# Altium PCB waffle.PcbDoc
Units mm, origin at the board's own origin, x right, y up, seen from the top; angles counter-clockwise.
Board outline 181 x 137.5 mm, 2 copper layers (Top Layer, Bottom Layer), stack 1.57 mm thick; 68 components, 42 nets, 632 pads, 68 vias.
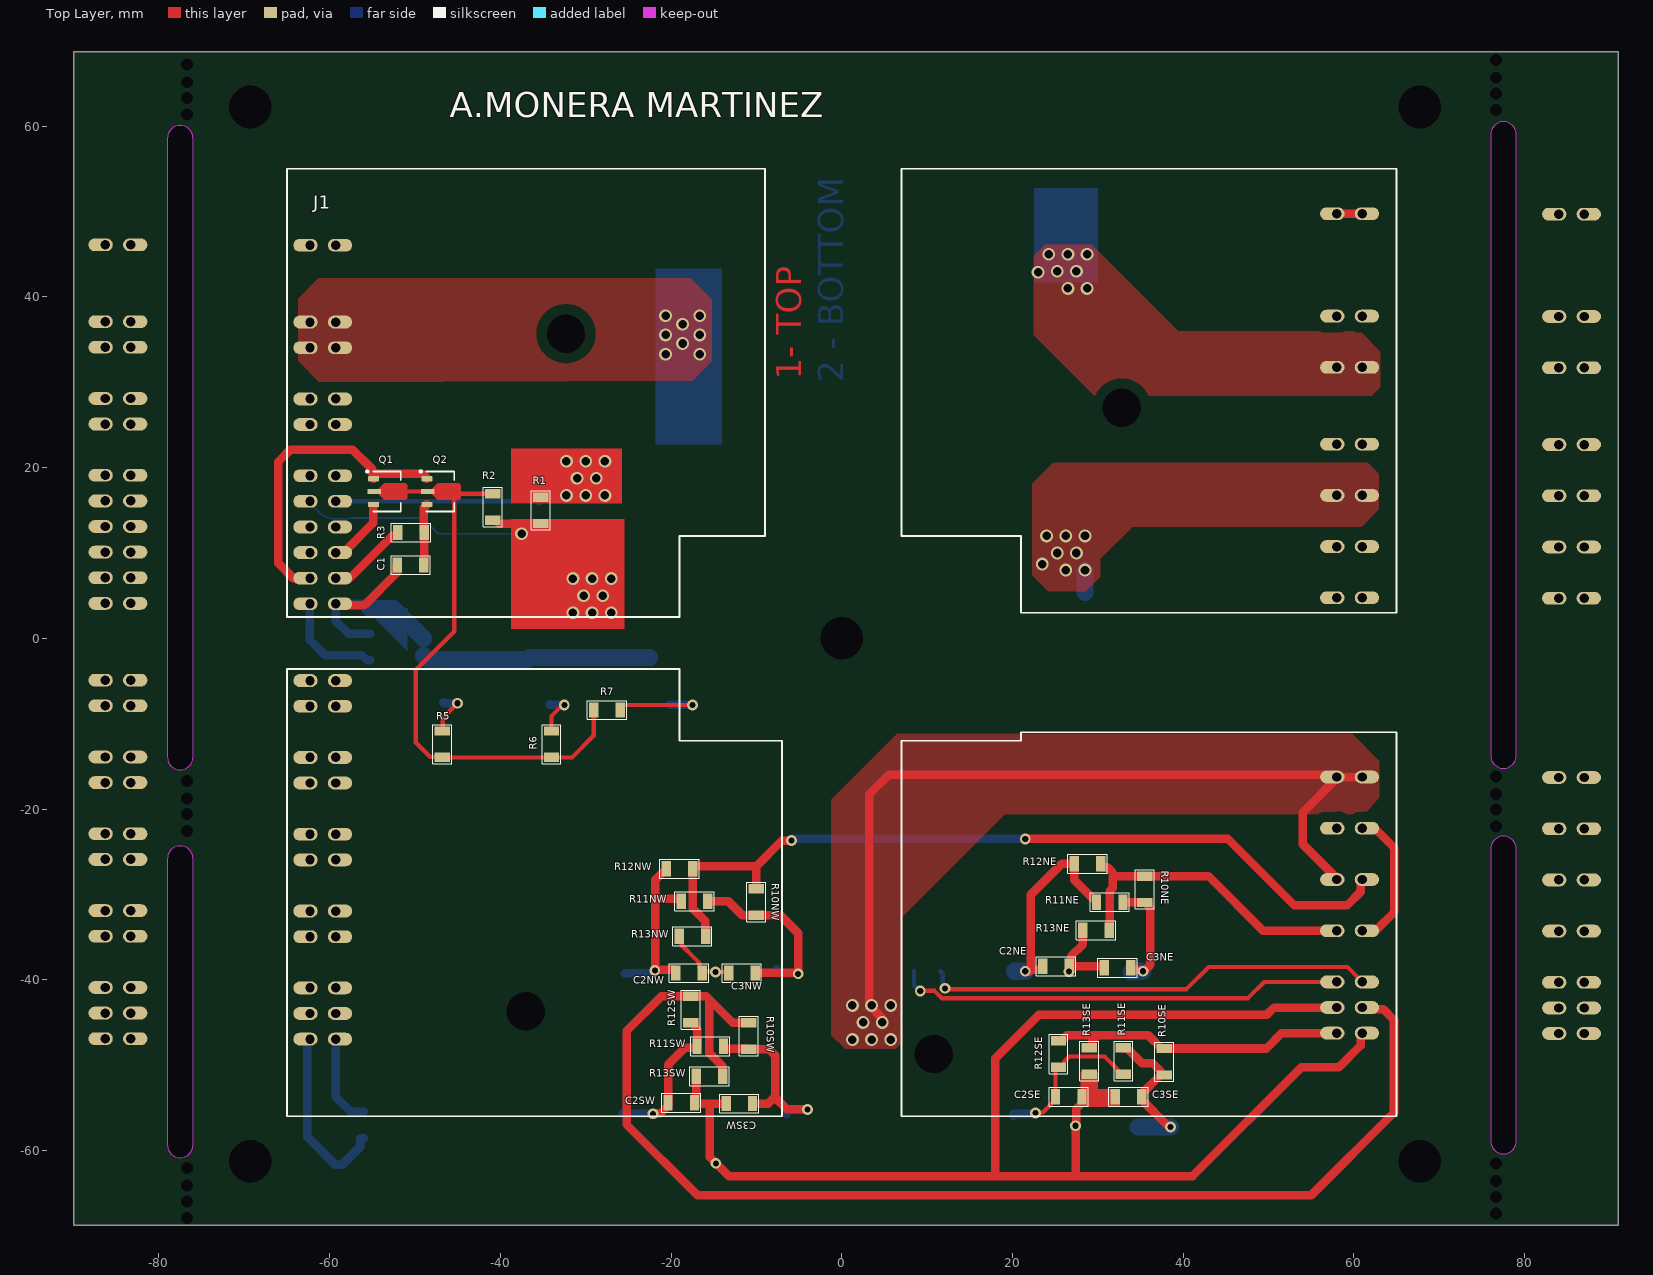
[diagram p0: Top Layer view]
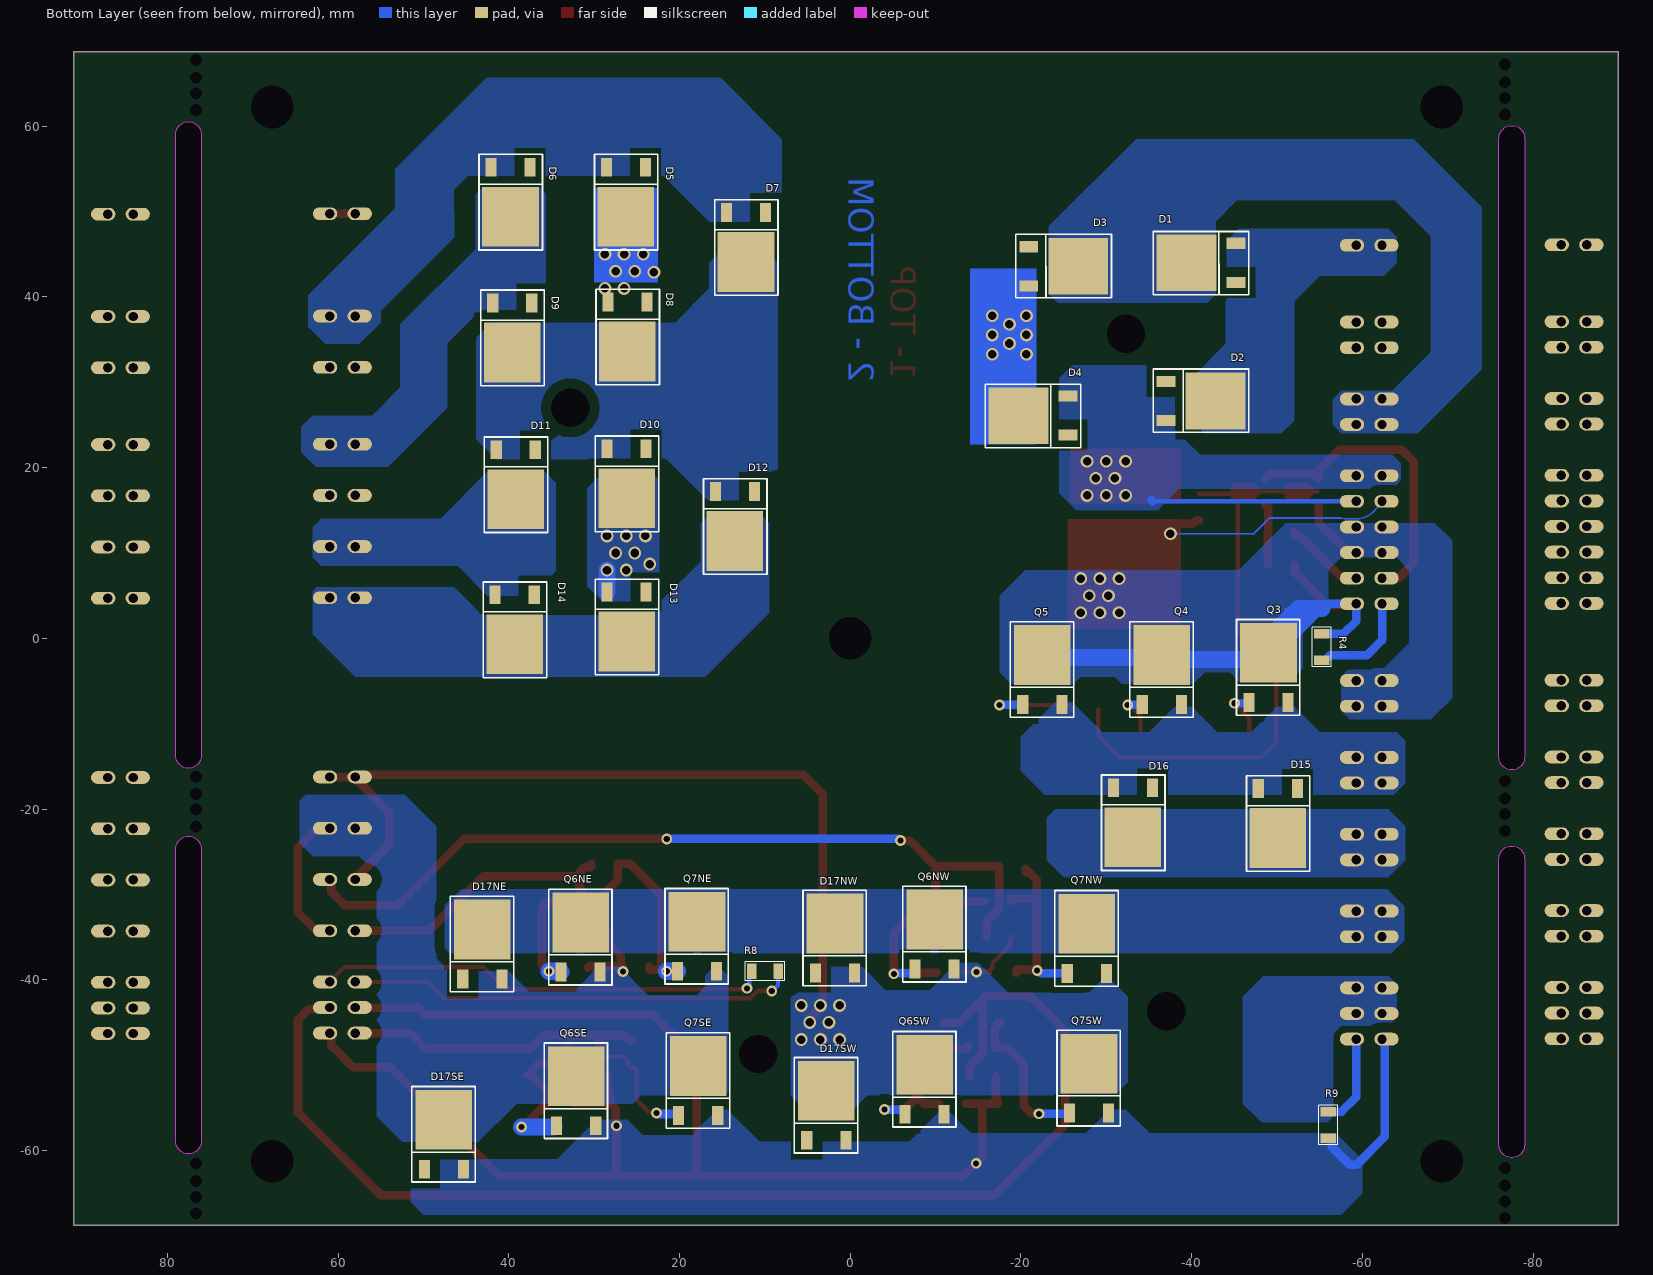
[diagram p1: Bottom Layer view, seen from below]

## Layer stack, top to bottom
Top Solder: solder mask 0.0254, SM-001, Dk 4
Top Layer: signal copper 0.035
Dielectric 1: core 1.5, Core-043, Dk 4.3
Bottom Layer: signal copper 0.035
Bottom Solder: solder mask 0.0254, SM-001, Dk 4

## Board outline
-90,-68.75 91,-68.75 91,68.75 -90,68.75
cut-out: -79,-13.9 ccw(c-77.5,-13.9) -76,-13.9 -76,58.575 ccw(c-77.5,58.575) -79,58.575
cut-out: -79,-59.325 ccw(c-77.5,-59.325) -76,-59.325 -76,-25.825 ccw(c-77.5,-25.825) -79,-25.825
cut-out: 76.025,-13.725 ccw(c77.525,-13.725) 79.025,-13.725 79.025,59.025 ccw(c77.525,59.025) 76.025,59.025
cut-out: 76.025,-58.9 ccw(c77.525,-58.9) 79.025,-58.9 79.025,-24.675 ccw(c77.525,-24.675) 76.025,-24.675

## Design rules (kind name [scope] priority, off if disabled: settings)
Clearance "Clearance_ hv" [InNetClass('HV_CLASS')] p1: gap=1.2 ignorepadtopadclearanceinfootprint=FALSE
Clearance "Clearance general" [All] p2: gap=0.2 ignorepadtopadclearanceinfootprint=FALSE
ComponentClearance ComponentClearance_1 [All] p1: gap=0.2 collisioncheckmode=3 verticalgap=0 showdistances=FALSE
ComponentClearance [All] p2: gap=0.254 collisioncheckmode=3 verticalgap=0.254 showdistances=FALSE
HoleSize [All] p1: absolutevalues=TRUE maxlimit=10 minlimit=0.5 maxpercent=80.000 minpercent=20.000
MinimumSolderMaskSliver [All] p1: minsoldermaskwidth=0.1
PlaneClearance [All] p1: clearance=0.5
PlaneConnect [All] p1: planeconnectstyle=Direct reliefexpansion=0.508 reliefentries=4 reliefconductorwidth=0.254 reliefairgap=0.254
PolygonConnect [All] p1: connectstyle=Direct reliefconductorwidth=0.254 reliefentries=4 polygonreliefangle="90 Angle" airgapwidth=0.254
RoomDefinition waffle [InComponentClass('waffle')] p1: confinementstyle=ConfineIn formatcopy=TRUE lockcomponents=FALSE outline -76.618,-69.312 76.382,-69.312 76.382,69.388 -76.618,69.388
RoomDefinition sw [InComponentClass('sw')] p2: confinementstyle=ConfineIn formatcopy=TRUE lockcomponents=FALSE outline -32.018,-60.612 6.882,-60.612 6.882,-40.812 -32.018,-40.812
RoomDefinition se [InComponentClass('se')] p3: confinementstyle=ConfineIn formatcopy=TRUE lockcomponents=FALSE outline 13.682,-64.012 51.682,-64.012 51.682,-46.012 13.682,-46.012
RoomDefinition nw [InComponentClass('nw')] p4: confinementstyle=ConfineIn formatcopy=TRUE lockcomponents=FALSE outline -31.818,-41.112 5.882,-41.112 5.882,-25.512 -31.818,-25.512
RoomDefinition ne [InComponentClass('ne')] p5: confinementstyle=ConfineIn formatcopy=TRUE lockcomponents=FALSE outline 13.882,-41.712 47.182,-41.712 47.182,-24.912 13.882,-24.912
RoutingVias [All] p1: holewidth=0.7 width=1.2 viastyle="Through Hole" minholewidth=0.5 minwidth=1.2 maxholewidth=3.2 maxwidth=5
SilkToSilkClearance [All] p1: silktosilkclearance=0.1
SilkToSolderMaskClearance [IsPad] p1: minsilkscreentomaskgap=0.1 clearancetoexposedcopper=TRUE
SolderMaskExpansion [All] p1: expansion=0.102 istentingtop=FALSE
SupplyNets "Schematic Supply Nets" [InNet('GND')] p1: voltage=0.000
Width bot [OnLayer('Bottom Layer')] p1: maxlimit=10 minlimit=0.2 preferedwidth=2
Width top [OnLayer('Top Layer')] p2: maxlimit=1 minlimit=0.5 preferedwidth=1
Width [All] p3: maxlimit=20 minlimit=1 preferedwidth=2
23 further rules are at their usual default settings.

## Classes and differential pairs
net class HV_CLASS: GND L2 N0A N1 N-N1 N-N1_SHUNT NetD1_A NetD1_K NetD2_A NetD3_A NetD7_K p P0A p1 T1A T4A T5A T6A T7A T8A
channel class "igbt pair": ne nw se sw
component class waffle: C1 D1 D2 D3 D4 D5 D6 D7 D8 D9 D10 D11 D12 D13 D14 D15 D16 J1 Q1 Q2 Q3 Q4 Q5 R1 R2 R3 R4 R5 R6 R7 R8 R9
component class sw: C2SW C3SW D17SW Q6SW Q7SW R10SW R11SW R12SW R13SW
component class se: C2SE C3SE D17SE Q6SE Q7SE R10SE R11SE R12SE R13SE
component class nw: C2NW C3NW D17NW Q6NW Q7NW R10NW R11NW R12NW R13NW
component class ne: C2NE C3NE D17NE Q6NE Q7NE R10NE R11NE R12NE R13NE

## Components (designator, comment, footprint, x,y, rotation, side; value= is the part's Value field where it differs from the comment)
C1 "1uf" 1206 -50.5,8.6 r180 top value=1uF
C2NE "1nF" 1206 25.1,-38.4 r0 top (schematic designator C2)
C2NW "1nF" 1206 -17.9,-39.2 r0 top (schematic designator C2)
C2SE "1nF" 1206 26.6,-53.7 r0 top (schematic designator C2)
C2SW "1nF" 1206 -18.8,-54.4 r0 top (schematic designator C2)
C3NE "1nF" 1206 32.3,-38.6 r180 top (schematic designator C3)
C3NW "1nF" 1206 -11.7,-39.2 r180 top (schematic designator C3)
C3SE "1nF" 1206 33.6,-53.7 r180 top (schematic designator C3)
C3SW "1nF" 1206 -12,-54.5 r180 top (schematic designator C3)
D1 "SE20DLJ-M3/I" "PG-TO252-3 - DIODE" -39.7,44 r90 bottom
D2 "SE20DLJ-M3/I" "PG-TO252-3 - DIODE" -42.5,27.81 r270 bottom
D3 "SE20DLJ-M3/I" "PG-TO252-3 - DIODE" -26.4,43.59 r270 bottom
D4 "SE20DLJ-M3/I" "PG-TO252-3 - DIODE" -20,26.09 r90 bottom
D5 "SE20DLJ-M3/I" "PG-TO252-3 - DIODE" 26.29,49.7 r0 bottom
D6 "SE20DLJ-M3/I" "PG-TO252-3 - DIODE" 39.81,49.7 r0 bottom
D7 "SE20DLJ-M3/I" "PG-TO252-3 - DIODE" 12.21,44.4 r0 bottom
D8 "SE20DLJ-M3/I" "PG-TO252-3 - DIODE" 26.11,33.9 r0 bottom
D9 "SE20DLJ-M3/I" "PG-TO252-3 - DIODE" 39.6,33.8 r0 bottom
D10 "SE20DLJ-M3/I" "PG-TO252-3 - DIODE" 26.2,16.7 r0 bottom
D11 "SE20DLJ-M3/I" "PG-TO252-3 - DIODE" 39.19,16.6 r0 bottom
D12 "SE20DLJ-M3/I" "PG-TO252-3 - DIODE" 13.51,11.7 r0 bottom
D13 "SE20DLJ-M3/I" "PG-TO252-3 - DIODE" 26.2,-0.066 r0 bottom
D14 "SE20DLJ-M3/I" "PG-TO252-3 - DIODE" 39.31,-0.4 r0 bottom
D15 "SE20DLJ-M3/I" "PG-TO252-3 - DIODE" -50.09,-23.1 r0 bottom
D16 "SE20DLJ-M3/I" "PG-TO252-3 - DIODE" -33.11,-23 r0 bottom
D17NE "SE20DLJ-M3/I" "PG-TO252-3 - DIODE" 43.11,-34.4 r180 bottom (schematic designator D17)
D17NW "SE20DLJ-M3/I" "PG-TO252-3 - DIODE" 1.79,-33.7 r180 bottom (schematic designator D17)
D17SE "SE20DLJ-M3/I" "PG-TO252-3 - DIODE" 47.61,-56.7 r180 bottom (schematic designator D17)
D17SW "SE20DLJ-M3/I" "PG-TO252-3 - DIODE" 2.81,-53.3 r180 bottom (schematic designator D17)
J1 "connector_waffle" WAFFLE -76,68.75 r0 top locked
Q1 "BCX53-16" SOT-89 -53.496,17.2 r0 top value=PNP
Q2 "BCX56-16" SOT-89 -47.246,17.2 r0 top value=NPN
Q3 "HGT1S10N120BNST" PG-TO252-3 -49,-2 r180 bottom
Q4 "HGT1S10N120BNST" PG-TO252-3 -36.5,-2.25 r180 bottom
Q5 "HGT1S10N120BNST" PG-TO252-3 -22.5,-2.25 r180 bottom
Q6NE "HGT1S10N120BNST" PG-TO252-3 31.59,-33.6 r180 bottom (schematic designator Q6)
Q6NW "HGT1S10N120BNST" PG-TO252-3 -9.882,-33.25 r180 bottom (schematic designator Q6)
Q6SE "HGT1S10N120BNST" PG-TO252-3 32.11,-51.6 r180 bottom (schematic designator Q6)
Q6SW "HGT1S10N120BNST" PG-TO252-3 -8.71,-50.25 r180 bottom (schematic designator Q6)
Q7NE "HGT1S10N120BNST" PG-TO252-3 17.96,-33.5 r180 bottom (schematic designator Q7)
Q7NW "HGT1S10N120BNST" PG-TO252-3 -27.71,-33.75 r180 bottom (schematic designator Q7)
Q7SE "HGT1S10N120BNST" PG-TO252-3 17.81,-50.4 r180 bottom (schematic designator Q7)
Q7SW "HGT1S10N120BNST" PG-TO252-3 -27.965,-50.123 r180 bottom (schematic designator Q7)
R1 "1mOHM" 1206 -35.25,15 r90 top
R2 "10K" 1206 -40.9,15.4 r270 top
R3 "43R" 1206 -50.45,12.4 r0 top
R4 "NB20N50104JBA" 1206 -55.25,-1 r90 bottom value=TH201
R5 "39R" 1206 -46.8,-12.4 r270 top
R6 "39R" 1206 -34,-12.4 r270 top
R7 "39R" 1206 -27.5,-8.4 r180 top
R8 "NB20N50104JBA" 1206 10,-39 r0 bottom value=TH201
R9 "1mOHM" 1206 -56,-57 r90 bottom
R10NE "10R" 1206 35.5,-29.4 r270 top (schematic designator R10)
R10NW "10R" 1206 -10,-30.9 r270 top (schematic designator R10)
R10SE "10R" 1206 37.8,-49.6 r270 top (schematic designator R10)
R10SW "10R" 1206 -10.9,-46.6 r270 top (schematic designator R10)
R11NE "10R" 1206 31.4,-30.9 r0 top (schematic designator R11)
R11NW "10R" 1206 -17.25,-30.8 r0 top (schematic designator R11)
R11SE "10R" 1206 33,-49.5 r90 top (schematic designator R11)
R11SW "10R" 1206 -15.4,-47.8 r0 top (schematic designator R11)
R12NE "10R" 1206 28.8,-26.4 r180 top (schematic designator R12)
R12NW "10R" 1206 -19,-27 r180 top (schematic designator R12)
R12SE "10R" 1206 25.4,-48.7 r270 top (schematic designator R12)
R12SW "10R" 1206 -17.7,-43.5 r270 top (schematic designator R12)
R13NE "1K" 1206 29.8,-34.2 r0 top (schematic designator R13)
R13NW "1K" 1206 -17.5,-34.9 r0 top (schematic designator R13)
R13SE "1K" 1206 29,-49.5 r90 top (schematic designator R13)
R13SW "1K" 1206 -15.5,-51.3 r0 top (schematic designator R13)

## Footprints (in the part's own frame and the unit in brackets; to place one, negate y for a bottom-side part, rotate by r counter-clockwise, add the part's x,y. Pads: shape width x height; smd on the part's side, far side on the other; paste and mask are expansions set on the pad)
1206 [mm] "Footprint 1206"
  rect 1.1x1.8 smd: 1(-1.55,0) 2(1.55,0)
  silkscreen extent -2.3,-1.1 2.3,1.1, body extent -1.61,-0.87 1.61,0.88, height 0.6
PG-TO252-3 [mm]
  rect 1.3x2.2 smd: 1(-2.29,-5.5) 2(2.29,-5.5)
  rect 6.63x7 smd: 3(0,0.3)
  silkscreen extent -3.75,-7 3.67,4.2, body extent -3.75,-6.25 3.75,3.5, height 2.41
"PG-TO252-3 - DIODE" [mm]
  rect 1.3x2.2 smd: A(2.29,-5.5) NC(-2.29,-5.5)
  rect 6.63x7 smd: K(0,0.3)
  silkscreen extent -3.75,-7 3.67,4.2, body extent -3.75,-6.25 3.75,3.5, height 2.41
SOT-89 [mm]
  rrect25% 1.3x0.6 smd: 1(-1.354,1.5) 3(-1.354,-1.5)
  rrect25% 1.6x0.6 smd: 2(-1.254,0)
  Top Layer region: -0.754,0.3 -0.104,0.95 2.425,0.95 2.613,0.762 2.613,-0.762 2.425,-0.95 -0.104,-0.95 -0.754,-0.3
  silkscreen extent -2.21,-2.35 1.85,2.47, body extent -1.75,-2.25 2.35,2.25, height 1.5
WAFFLE [mm]
  oval 2.5x1.5 smd: 1(13,-22.7) 2(17.4,-22.7) 3(13,-31.7) 4(17.4,-31.7) 5(13,-34.7) 6(17.4,-34.7) 7(13,-40.7) 8(17.4,-40.7) 9(13,-43.7) 10(17.4,-43.7) 11(13,-49.7) 12(17.4,-49.7) 13(13,-52.7) 14(17.4,-52.7) 15(13,-55.7) 16(17.4,-55.7) 17(13,-58.7) 18(17.4,-58.7) 19(13,-61.7) 20(17.4,-61.7) 21(13,-64.7) 22(17.4,-64.7) 23(13,-73.7) 24(17.4,-73.7) 25(13,-76.7) 26(17.4,-76.7) 27(13,-82.7) 28(17.4,-82.7) 29(13,-85.7) 30(17.4,-85.7) 31(13,-91.7) 32(17.4,-91.7) 33(13,-94.7) 34(17.4,-94.7) 35(13,-100.7) 36(17.4,-100.7) 37(13,-103.7) 38(17.4,-103.7) 39(13,-109.7) 40(17.4,-109.7) 41(13,-112.7) 42(17.4,-112.7) 43(13,-115.7) 44(17.4,-115.7) 45(133.3,-19.005) 46(137.7,-19.005) 47(133.3,-31) 48(137.7,-31) 49(133.3,-37) 50(137.7,-37) 51(133.3,-46) 52(137.7,-46) 53(133.3,-52) 54(137.7,-52) 55(133.3,-58) 56(137.7,-58) 57(133.3,-64) 58(137.7,-64) 59(133.3,-85) 60(137.7,-85) 61(133.3,-91) 62(137.7,-91) 63(133.3,-97) 64(137.7,-97) 65(133.3,-103) 66(137.7,-103) 67(133.3,-109) 68(137.7,-109) 69(133.3,-112) 70(137.7,-112) 71(133.3,-115) 72(137.7,-115)
  oval 2.5x1.5 smd far side: 1(13,-22.7) 2(17.4,-22.7) 3(13,-31.7) 4(17.4,-31.7) 5(13,-34.7) 6(17.4,-34.7) 7(13,-40.7) 8(17.4,-40.7) 9(13,-43.7) 10(17.4,-43.7) 11(13,-49.7) 12(17.4,-49.7) 13(13,-52.7) 14(17.4,-52.7) 15(13,-55.7) 16(17.4,-55.7) 17(13,-58.7) 18(17.4,-58.7) 19(13,-61.7) 20(17.4,-61.7) 21(13,-64.7) 22(17.4,-64.7) 23(13,-73.7) 24(17.4,-73.7) 25(13,-76.7) 26(17.4,-76.7) 27(13,-82.7) 28(17.4,-82.7) 29(13,-85.7) 30(17.4,-85.7) 31(13,-91.7) 32(17.4,-91.7) 33(13,-94.7) 34(17.4,-94.7) 35(13,-100.7) 36(17.4,-100.7) 37(13,-103.7) 38(17.4,-103.7) 39(13,-109.7) 40(17.4,-109.7) 41(13,-112.7) 42(17.4,-112.7) 43(13,-115.7) 44(17.4,-115.7) 45(133.3,-19.005) 46(137.7,-19.005) 47(133.3,-31) 48(137.7,-31) 49(133.3,-37) 50(137.7,-37) 51(133.3,-46) 52(137.7,-46) 53(133.3,-52) 54(137.7,-52) 55(133.3,-58) 56(137.7,-58) 57(133.3,-64) 58(137.7,-64) 59(133.3,-85) 60(137.7,-85) 61(133.3,-91) 62(137.7,-91) 63(133.3,-97) 64(137.7,-97) 65(133.3,-103) 66(137.7,-103) 67(133.3,-109) 68(137.7,-109) 69(133.3,-112) 70(137.7,-112) 71(133.3,-115) 72(137.7,-115)
  oval 1.8x1.5 hole 1.1: 1(13.7,-22.7) 2(16.7,-22.7) 3(13.7,-31.7) 4(16.7,-31.7) 5(13.7,-34.7) 6(16.7,-34.7) 7(13.7,-40.7) 8(16.7,-40.7) 9(13.7,-43.7) 10(16.7,-43.7) 11(13.7,-49.7) 12(16.7,-49.7) 13(13.7,-52.7) 14(16.7,-52.7) 15(13.7,-55.7) 16(16.7,-55.7) 17(13.7,-58.7) 18(16.7,-58.7) 19(13.7,-61.7) 20(16.7,-61.7) 21(13.7,-64.7) 22(16.7,-64.7) 23(13.7,-73.7) 24(16.7,-73.7) 25(13.7,-76.7) 26(16.7,-76.7) 27(13.7,-82.7) 28(16.7,-82.7) 29(13.7,-85.7) 30(16.7,-85.7) 31(13.7,-91.7) 32(16.7,-91.7) 33(13.7,-94.7) 34(16.7,-94.7) 35(13.7,-100.7) 36(16.7,-100.7) 37(13.7,-103.7) 38(16.7,-103.7) 39(13.7,-109.7) 40(16.7,-109.7) 41(13.7,-112.7) 42(16.7,-112.7) 43(13.7,-115.7) 44(16.7,-115.7) 45(134,-19.005) 46(137,-19.005) 47(134,-31) 48(137,-31) 49(134,-37) 50(137,-37) 51(134,-46) 52(137,-46) 53(134,-52) 54(137,-52) 55(134,-58) 56(137,-58) 57(134,-64) 58(137,-64) 59(134,-85) 60(137,-85) 61(134,-91) 62(137,-91) 63(134,-97) 64(137,-97) 65(134,-103) 66(137,-103) 67(134,-109) 68(137,-109) 69(134,-112) 70(137,-112) 71(134,-115) 72(137,-115)
  round 0 hole 5: S(6.7,-130) S(6.7,-6.5) S(76,-68.75) S(143.7,-130) S(143.7,-6.5)

## Part data
C1: library part CAP_1uF, "1206 1UF 50V", Tolerance=1-5%, Voltage=50V
C2NE C2NW C2SE C2SW C3NE C3NW C3SE C3SW: library part CAP_1nF, "CAPACITOR 1nF 1206", Tolerance=1-5%, Voltage=50V
D1 D2 D3 D4: library part 25V60, "Diode rectifier 1V/1A/700V", Supplier Part Number 1=112-VS-E5TX3012S2L-M3CT-ND, Supplier 1=Digikey, Supplier 2=Mouser, Supplier Part Number 2=78-VS-E5TX3012S2L-M3
D5 D6 D7 D8 D9 D10 D11 D12 D13 D14 D15 D16: library part 20L60U, "Diode rectifier 1V/1A/700V", Supplier Part Number 1=78-VS-E5TX3012S2L-M3, Supplier 1=Mouser
D17NE D17NW D17SE D17SW: library part STTH5R06B, Supplier Part Number 1=78-VS-E5TX3012S2L-M3, Supplier 1=Mouser
Q1: "BCX53-16   PNP", Supplier Part Number 1=726-BCX5316H6327XTSA, ki_description="Symbol for NPN BJT", ki_keywords="NPN Bipolar Transistor", Reference=Q, Supplier 1=Mouser
Q2: "BCX56-16 / NPN", Supplier Part Number 1=726-BCX5616H6327XTSA, ki_description="Symbol for NPN BJT", ki_keywords="NPN Bipolar Transistor", Reference=Q, Supplier 1=Mouser
Q3 Q4 Q6NE Q6NW Q6SE Q6SW Q7NE Q7NW Q7SE Q7SW: library part FGB20N60SF, "IGBT N type 20A(40) 600V dpakpossible replacement STB27NM60ND / FGB20N60SF / RJP6012", Supplier Part Number 1=8076660P, Supplier 1=Rs, Supplier 2=Mouser, Supplier Part Number 2=512-HGT1S10N120BNST
Q5: library part FGB20N60SF, "HGT1S10N120BNST / IGBT N type 20A(40) 600V dpakpossible replacement STB27NM60ND / FGB20N60SF / RJP6012", Supplier Part Number 1=8076660P, Supplier 1=Rs, Supplier 2=Mouser, Supplier Part Number 2=512-HGT1S10N120BNST
R1 R9: library part RES_shunt, "resistor 1206 1mohm.", Power=1/2W, Tolerance=1%
R2: library part RES_10K, "resistor 10K 1206", Power=1/2W, Tolerance=1%
R3: library part RES_43R, "resistor 43R 1206", Power=1/2W, Tolerance=1%
R4 R8: library part RES_TH, "NB20N50104JBA: resistor NTC 100K", Power=1/2W, Tolerance=1%
R5 R6 R7: library part RES_39R, "resistor 39R 1206", Power=1/2W, Tolerance=1%
R10NE R10NW R10SE R10SW R11NE R11NW R11SE R11SW R12NE R12NW R12SE R12SW: library part RES_10R, "resistor", Power=1/2W, Tolerance=1%
R13NE R13NW R13SE R13SW: library part RES_1K, "resistor 1k 1206", Power=1/2W, Tolerance=1%

## Free pads (board coordinates)
  oval 2.5x1.5 smd: 1(-87,46.1) 2(-82.6,46.1) 3(-87,37.1) 4(-82.6,37.1) 5(-87,34.1) 6(-82.6,34.1) 7(-87,28.1) 8(-82.6,28.1) 9(-87,25.1) 10(-82.6,25.1) 11(-87,19.1) 12(-82.6,19.1) 13(-87,16.1) 14(-82.6,16.1) 15(-87,13.1) 16(-82.6,13.1) 17(-87,10.1) 18(-82.6,10.1) 19(-87,7.1) 20(-82.6,7.1) 21(-87,4.1) 22(-82.6,4.1) 23(-87,-4.9) 24(-82.6,-4.9) 25(-87,-7.9) 26(-82.6,-7.9) 27(-87,-13.9) 28(-82.6,-13.9) 29(-87,-16.9) 30(-82.6,-16.9) 31(-87,-22.9) 32(-82.6,-22.9) 33(-87,-25.9) 34(-82.6,-25.9) 35(-87,-31.9) 36(-82.6,-31.9) 37(-87,-34.9) 38(-82.6,-34.9) 39(-87,-40.9) 40(-82.6,-40.9) 41(-87,-43.9) 42(-82.6,-43.9) 43(-87,-46.9) 44(-82.6,-46.9) 45(83.3,49.695) 46(87.7,49.695) 47(83.3,37.7) 48(87.7,37.7) 49(83.3,31.7) 50(87.7,31.7) 51(83.3,22.7) 52(87.7,22.7) 53(83.3,16.7) 54(87.7,16.7) 55(83.3,10.7) 56(87.7,10.7) 57(83.3,4.7) 58(87.7,4.7) 59(83.3,-16.3) 60(87.7,-16.3) 61(83.3,-22.3) 62(87.7,-22.3) 63(83.3,-28.3) 64(87.7,-28.3) 65(83.3,-34.3) 66(87.7,-34.3) 67(83.3,-40.3) 68(87.7,-40.3) 69(83.3,-43.3) 70(87.7,-43.3) 71(83.3,-46.3) 72(87.7,-46.3)
  oval 2.5x1.5 smd far side: 1(-87,46.1) 2(-82.6,46.1) 3(-87,37.1) 4(-82.6,37.1) 5(-87,34.1) 6(-82.6,34.1) 7(-87,28.1) 8(-82.6,28.1) 9(-87,25.1) 10(-82.6,25.1) 11(-87,19.1) 12(-82.6,19.1) 13(-87,16.1) 14(-82.6,16.1) 15(-87,13.1) 16(-82.6,13.1) 17(-87,10.1) 18(-82.6,10.1) 19(-87,7.1) 20(-82.6,7.1) 21(-87,4.1) 22(-82.6,4.1) 23(-87,-4.9) 24(-82.6,-4.9) 25(-87,-7.9) 26(-82.6,-7.9) 27(-87,-13.9) 28(-82.6,-13.9) 29(-87,-16.9) 30(-82.6,-16.9) 31(-87,-22.9) 32(-82.6,-22.9) 33(-87,-25.9) 34(-82.6,-25.9) 35(-87,-31.9) 36(-82.6,-31.9) 37(-87,-34.9) 38(-82.6,-34.9) 39(-87,-40.9) 40(-82.6,-40.9) 41(-87,-43.9) 42(-82.6,-43.9) 43(-87,-46.9) 44(-82.6,-46.9) 45(83.3,49.695) 46(87.7,49.695) 47(83.3,37.7) 48(87.7,37.7) 49(83.3,31.7) 50(87.7,31.7) 51(83.3,22.7) 52(87.7,22.7) 53(83.3,16.7) 54(87.7,16.7) 55(83.3,10.7) 56(87.7,10.7) 57(83.3,4.7) 58(87.7,4.7) 59(83.3,-16.3) 60(87.7,-16.3) 61(83.3,-22.3) 62(87.7,-22.3) 63(83.3,-28.3) 64(87.7,-28.3) 65(83.3,-34.3) 66(87.7,-34.3) 67(83.3,-40.3) 68(87.7,-40.3) 69(83.3,-43.3) 70(87.7,-43.3) 71(83.3,-46.3) 72(87.7,-46.3)
  oval 1.8x1.5 hole 1.1: 1(-86.3,46.1) 2(-83.3,46.1) 3(-86.3,37.1) 4(-83.3,37.1) 5(-86.3,34.1) 6(-83.3,34.1) 7(-86.3,28.1) 8(-83.3,28.1) 9(-86.3,25.1) 10(-83.3,25.1) 11(-86.3,19.1) 12(-83.3,19.1) 13(-86.3,16.1) 14(-83.3,16.1) 15(-86.3,13.1) 16(-83.3,13.1) 17(-86.3,10.1) 18(-83.3,10.1) 19(-86.3,7.1) 20(-83.3,7.1) 21(-86.3,4.1) 22(-83.3,4.1) 23(-86.3,-4.9) 24(-83.3,-4.9) 25(-86.3,-7.9) 26(-83.3,-7.9) 27(-86.3,-13.9) 28(-83.3,-13.9) 29(-86.3,-16.9) 30(-83.3,-16.9) 31(-86.3,-22.9) 32(-83.3,-22.9) 33(-86.3,-25.9) 34(-83.3,-25.9) 35(-86.3,-31.9) 36(-83.3,-31.9) 37(-86.3,-34.9) 38(-83.3,-34.9) 39(-86.3,-40.9) 40(-83.3,-40.9) 41(-86.3,-43.9) 42(-83.3,-43.9) 43(-86.3,-46.9) 44(-83.3,-46.9) 45(84,49.695) 46(87,49.695) 47(84,37.7) 48(87,37.7) 49(84,31.7) 50(87,31.7) 51(84,22.7) 52(87,22.7) 53(84,16.7) 54(87,16.7) 55(84,10.7) 56(87,10.7) 57(84,4.7) 58(87,4.7) 59(84,-16.3) 60(87,-16.3) 61(84,-22.3) 62(87,-22.3) 63(84,-28.3) 64(87,-28.3) 65(84,-34.3) 66(87,-34.3) 67(84,-40.3) 68(87,-40.3) 69(84,-43.3) 70(87,-43.3) 71(84,-46.3) 72(87,-46.3)
  round 0 hole 4.5 unplated: 3(-37,-43.7) 3(-32.3,35.7) 3(10.8,-48.7) 3(32.8,27)
  round 0 hole 1.4 unplated: 73(-76.7,-67.9) 73(-76.7,-65.95) 73(-76.7,-64.125) 73(-76.7,-62.05) 73(-76.7,-22.55) 73(-76.7,-20.6) 73(-76.7,-18.775) 73(-76.7,-16.7) 73(-76.7,61.375) 73(-76.7,63.325) 73(-76.7,65.15) 73(-76.7,67.225) 73(76.65,-67.375) 73(76.65,-65.425) 73(76.65,-63.6) 73(76.65,-61.525) 73(76.65,-22.025) 73(76.65,-20.075) 73(76.65,-18.25) 73(76.65,-16.175) 73(76.65,61.9) 73(76.65,63.85) 73(76.65,65.675) 73(76.65,67.75)

## Via types
v1: diameter 1.5, hole 1, Top Layer to Bottom Layer, tented both sides, 49 vias
v2: diameter 1.27, hole 0.711, Top Layer to Bottom Layer, tented both sides, 17 vias
v3: diameter 1.27, hole 0.711, Top Layer to Bottom Layer, 2 vias

## Nets (pads, with @x,y where several pads share a name; then routed paths per layer and width w, separated by ;. In a path a pad name is that pad's centre, name@x,y a point inside that pad or via, vN(x,y) a via of type N, cw(c..) or ccw(c..) an arc to the next point about the centre after c; other vN are vias at no path point)
GND: J1.45 J1.46 | length 3
  Top Layer w1: J1.45@58,49.745 J1.46@61,49.745
L2: D15.A D16.A J1.27 J1.28 J1.29 J1.30 Q3.2 Q4.2 Q5.2
N0A: D5.A D6.A D7.A J1.47 J1.48
N1: C1.2 J1.13 J1.15 J1.16 J1.17 J1.18 J1.22 J1.23 J1.24 J1.25 J1.26 Q1.3 Q3.3 Q4.3 Q5.3 R1.1 R2.2 R4.2 | length 102.1
  Top Layer w1: J1.22@-59.3,4.05 -58.6,4.05 -58.504,3.954 -57.651,3.954 -57.596,3.9 -56,3.9 -55.9,4 -55.8,4 -52.1,7.7 -52.1,8.55 C1.2 ; J1.18@-59.3,10.05 -59.204,10.146 -58.14,10.146 -57.85,10.435 -57.85,10.55 -54.905,13.495 -54.905,15.395 Q1.3@-54.8,15.5 ; R2.2 -40.55,13.85 -40.15,13.45 -35.55,13.45 -32.099,9.999 -32.099,7.802
  Bottom Layer w0.2: J1.13@-62.3,16.05 -61.418,14.979 -61.417,14.978 ccw(c-59.557,16.509) -60.66,14.367 -60.388,14.227 ccw(c-59.863,15.249) -60.382,14.224 ccw(c-59.45,16.05) -59.45,14 -59.15,14 ccw(c-59.15,16.05) -59.125,14 ccw(c-59.1,16.05) -59.1,14 -58.1,14 ccw(c-58.1,16.05) -57.631,14.054 -57.437,14.1 -49.1,14.1 -48.954,13.954 -47.25,12.25 -47.043,12.25 v1(-37.5,12.25)
  Bottom Layer w1: R4.2 -57.8,0.55 -59.3,2.05 -59.3,4.05 -58.6,4.05 -55.8,4.05 -55.25,3.5
  Bottom Layer w2: -55.25,3.5 -52.5,3.5 Q3.3@-49,0 ; Q3.3@-49,-2 -48.5,-2.5 -36.75,-2.5 -36.5,-2.25 Q5.3@-22.5,-2.25
  other v1: -31.5,3 -29.25,3 -27,3 -30.25,5 -28,5 -31.5,7 -29.25,7 -27,7
N-N1: J1.39 J1.40 J1.41 J1.42 J1.44 R9.2 | length 10.8
  Bottom Layer w1: J1.44@-59.3,-46.95 -59.3,-53.7 -57.561,-55.439 -56.011,-55.439 R9.2
N-N1_SHUNT: C2SE.2 C2SW.2 C3SE.2 C3SW.2 D17SE.A D17SW.A J1.43 J1.69 J1.72 Q6SE.2 Q6SW.2 Q7SE.2 Q7SW.2 R9.1 R13SE.1 R13SW.1 | length 187.6
  Top Layer w1: C2SW.2 -17.25,-54.45 -17.2,-54.5 -15.45,-54.5 ; C2SW.2@-17.2,-54 -17.05,-53.85 R13SW.1@-17.05,-51.329 ; C3SW.2 -15.45,-54.5 ; C2SE.2 28.15,-54.45 27.452,-55.148 27.452,-57.048 v2(27.4,-57.1) 27.4,-63 ; 29,-52.8 29,-51.9 R13SE.1 ; J1.69@58,-43.25 57.3,-43.25 50.65,-43.25 49.8,-44.1 23.1,-44.1 18,-49.2 18,-63 ; J1.72@61.7,-46.25 61,-46.25 60.784,-46.466 60.784,-47.716 58.25,-50.25 53.85,-50.25 41.1,-63 27.4,-63 ; -15.45,-54.5 -15.45,-60.779 -14.75,-61.479 v2(-14.75,-61.5) -14.731,-61.5 -13.231,-63 18,-63 ; 18,-63 27.4,-63
  Bottom Layer w1: J1.43@-62.3,-46.95 -62.369,-46.95 -62.6,-47.181 -62.6,-58.4 -59.336,-61.664 -58.508,-61.664 -56.4,-59.556 -56.4,-58.6 -56.35,-58.55 R9.1
NetC1_1: C1.1 Q2.3 R3.2 | length 7.3
  Top Layer w1: C1.1 -48.9,8.65 R3.2 -48.95,12.45 -48.95,15.3 -48.6,15.65 Q2.3
NetC2NE_1: C2NE.1 Q7NE.1 R11NE.1 R12NE.2 | length 25
  Top Layer w1: v2(21.5,-39) 21.573,-39 21.634,-39.061 21.939,-39.061 22.1,-38.9 22.173,-38.9 22.273,-38.8 23.5,-38.8 23.55,-38.75 C2NE.1 ; 22.152,-38.848 22.152,-30.048 25.786,-26.414 27.236,-26.414 R12NE.2 27.25,-28.3 29.45,-30.5 29.8,-30.5 29.85,-30.55 R11NE.1
  Bottom Layer w2: Q7NE.1 v2(21.5,-39)
NetC2NW_1: C2NW.1 Q7NW.1 R11NW.1 R12NW.2 | length 22.5
  Top Layer w1: v2(-21.9,-38.9) v2@-21.848,-38.848 ; R12NW.2 -20.55,-27.35 -20.6,-27.4 -20.95,-27.4 -21.848,-28.298 -21.848,-30.5 ; C2NW.1 -19.45,-38.85 -19.5,-38.8 -19.715,-38.8 -19.765,-38.75 -20.25,-38.75 -20.348,-38.848 v2@-21.848,-38.848 ; R11NW.1 -18.8,-30.55 -18.85,-30.5 -21.848,-30.5 ; v2@-21.848,-38.848 -21.848,-31.4 -21.848,-30.5
  Bottom Layer w1: Q7NW.1 -22.323,-39.25 -21.973,-38.9 v2(-21.9,-38.9)
NetC2SE_1: C2SE.1 Q7SE.1 R11SE.1 R12SE.2 | length 19
  Top Layer w0.5: v2(22.7,-55.6) 22.752,-55.548 23.552,-55.548 25.05,-54.05 25.05,-50.55 R12SE.2@25.35,-50.25 ; R12SE.2 25.75,-50.25 26.05,-49.95 26.05,-49.6 26.65,-49 30.8,-49 32.35,-50.55 32.35,-50.75 32.65,-51.05 R11SE.1
  Bottom Layer w1: Q7SE.1 20.1,-55.725 22.502,-55.725 22.627,-55.6 v2(22.7,-55.6)
NetC2SW_1: C2SW.1 Q7SW.1 R11SW.1 R12SW.2 | length 18.1
  Top Layer w1: v2(-22.1,-55.7) -22.048,-55.648 -21.248,-55.648 -20.325,-54.725 C2SW.1@-20.325,-54.45 ; C2SW.1 -20.35,-49.95 -18.361,-47.961 -17,-47.961 -16.95,-47.911 -16.95,-45.8 -17.3,-45.45 -17.3,-45.1 -17.35,-45.05 R12SW.2
  Bottom Layer w1: Q7SW.1 -25.6,-55.623 -25.525,-55.698 -22.102,-55.698 v2(-22.1,-55.7)
NetC3NE_1: C3NE.1 Q6NE.1 R10NE.2 R11NE.2 | length 14.7
  Top Layer w1: R11NE.2 35.1,-30.9 35.15,-30.95 35.85,-30.95 35.9,-31 35.9,-31.35 36.165,-31.615 36.165,-38.26 35.477,-38.948 35.352,-38.948 v2(35.3,-39) 35.227,-39 35.027,-38.8 33.85,-38.8 C3NE.1
  Bottom Layer w2: Q6NE.1 33.98,-39 v2(35.3,-39)
NetC3NW_1: C3NW.1 Q6NW.1 R10NW.2 R11NW.2 | length 24.9
  Top Layer w1: R11NW.2 -13.3,-30.8 -11.65,-32.45 -7.2,-32.45 -5.1,-34.55 v2(-5.1,-39.3) -5.173,-39.3 -5.273,-39.2 C3NW.1
  Bottom Layer w1: Q6NW.1 -7.592,-39.098 -7.442,-39.248 -5.152,-39.248 v2(-5.1,-39.3)
NetC3SE_1: C3SE.1 Q6SE.1 R10SE.2 R11SE.2 | length 19
  Top Layer w1: R11SE.2 33.05,-48 33.4,-48 35.2,-49.8 36.45,-49.8 37.4,-50.75 37.4,-51.1 37.45,-51.15 R10SE.2 ; C3SE.1 C3SE.1@35.15,-54.05 ; R10SE.2@37.4,-51.15 37.4,-51.2 37.3,-51.2 35.2,-53.3 35.2,-54 C3SE.1@35.15,-54.05 ; v2(38.5,-57.25) 38.448,-57.198 38.298,-57.198 C3SE.1@35.15,-54.05
  Bottom Layer w2: Q6SE.1@34.7,-57.25 v2(38.5,-57.25)
NetC3SW_1: C3SW.1 Q6SW.1 R10SW.2 R11SW.2 | length 21.5
  Top Layer w1: R11SW.2 -13.85,-47.85 -13.65,-48.05 -13.6,-48.1 -10.95,-48.1 R10SW.2 -8.5,-48.15 -7.8,-48.85 -7.8,-53.7 -8.6,-54.5 C3SW.1 ; -7.779,-53.821 -6.452,-55.148 -4.052,-55.148 v2(-4,-55.2)
  Bottom Layer w1: Q6SW.1 -6.42,-55.402 -6.27,-55.252 -4.052,-55.252 v2(-4,-55.2)
NetD1_A: D1.A D2.K J1.1 J1.2
NetD1_K: D1.K D3.K J1.7 J1.8 J1.9 J1.10
NetD2_A: D2.A D4.A J1.11 J1.12 J1.14 R1.2 | length 24.2
  Top Layer w1: J1.12@-59.3,19.05 J1.12@-59.264,19.05
  Bottom Layer w0.5: J1.14@-59.3,16.05 -35.45,16.05
  Bottom Layer w1: -35.45,16.05 -35.25,16.25
  other v1: -32.25,16.75 -30,16.75 -27.75,16.75 -31,18.75 -28.75,18.75 -32.25,20.75 -30,20.75 -27.75,20.75
NetD3_A: D3.A D4.K J1.3 J1.4 J1.5 J1.6
  other v1: -20.644,33.291 -16.644,33.291 -18.644,34.541 -20.644,35.541 -16.644,35.541 -18.644,36.791 -20.644,37.791 -16.644,37.791
NetD7_K: D7.K D8.K D9.K D10.A D11.A D12.A
NetJ1_19: J1.19 Q1.1 Q2.1 | length 36.3
  Top Layer w1: J1.19@-62.3,7.05 -64.25,7.05 -66,8.8 -66,20.7 -64.6,22.1 -57.3,22.1 -55,19.8 -55,19.3 ; Q1.1 -54.7,18.85 -54.7,19.15 -54.55,19.3 -49.15,19.3 -48.6,18.75 Q2.1
NetJ1_20: J1.20 R3.1 | length 9.8
  Top Layer w1: J1.20@-59.3,7.05 J1.20@-58.85,7.05 ; J1.20@-58.919,7.05 -58.919,7.146 -57.54,7.146 -52.685,12 -52.05,12 -52,12.05 R3.1
NetJ1_21: J1.21 R4.1 | length 12.3
  Bottom Layer w1: J1.21@-62.3,4.05 -62.3,-0.2 -60.5,-2 -56.15,-2 -55.6,-2.55 R4.1
NetJ1_64: J1.64 R10NW.1 R12NW.1 R13NW.2 | length 96.1
  Top Layer w1: R12NW.1 -17.45,-26.75 -17.4,-26.7 -10,-26.7 ; R12NW.1@-17.4,-27.4 -17.45,-27.4 -17.45,-31.65 -16,-33.1 -16,-34.85 R13NW.2 ; R10NW.1 -10,-26.7 ; v2(-5.9,-23.7) -7,-23.7 -10,-26.7 ; v2(21.5,-23.5) 45.25,-23.5 53,-31.25 59.25,-31.25 60.809,-29.691 60.809,-28.441 J1.64@61,-28.25
  Bottom Layer w1: v2(-5.9,-23.7) -5.827,-23.7 -5.627,-23.5 v2(21.5,-23.5)
NetJ1_65: J1.65 R10NE.1 R12NE.1 R13NE.2 | length 37.7
  Top Layer w1: R12NE.1 30.35,-26.75 30.4,-26.8 31.114,-26.8 31.7,-27.386 ; R13NE.2 31.4,-34.15 31.4,-29.61 31.75,-29.26 31.75,-27.85 R10NE.1 ; R10NE.1@35.15,-27.85 42.95,-27.85 49.35,-34.25 J1.65@58,-34.25
NetJ1_67: J1.67 R8.1 | length 52.6
  Top Layer w0.5: v3(9.2,-41.3) 10.866,-41.3 11.716,-42.15 47.6,-42.15 49.5,-40.25 J1.67@58,-40.25
  Bottom Layer w0.5: R8.1 8.475,-39.025 8.475,-40.65 9.125,-41.3 v3(9.2,-41.3)
NetJ1_68: J1.68 R8.2 | length 53
  Top Layer w0.5: v3(12.1,-41) 12.2,-41.1 40.4,-41.1 43,-38.5 59.25,-38.5 J1.68@61,-40.25
  Bottom Layer w0.5: R8.2 11.85,-39.3 11.85,-40.542 12.1,-40.792 v3(12.1,-41)
NetJ1_70: J1.70 R10SW.1 R12SW.1 R13SW.2 | length 149.6
  Top Layer w1: -15.5,-42.3 -15.5,-48.6 -14,-50.1 -14,-51.25 R13SW.2 ; R10SW.1 -12.75,-45.05 -15.85,-41.95 R12SW.1 -21.15,-41.95 -25.2,-46 -25.2,-56.938 -16.888,-65.25 55,-65.25 64.7,-55.55 64.7,-44.7 63.441,-43.441 J1.70@61.7,-43.441
NetJ1_71: J1.71 R10SE.1 R12SE.1 R13SE.2 | length 36.2
  Top Layer w1: R12SE.1 25.75,-47.15 25.8,-47.1 25.8,-47.086 26.386,-46.5 29.986,-46.5 ; R13SE.2 29.35,-47.95 29.35,-47.146 ; 29.4,-47.086 29.986,-46.5 ; J1.71@58,-46.25 51.55,-46.25 49.75,-48.05 R10SE.1 37.45,-48.05 35.9,-46.5 29.986,-46.5
NetQ1_2: Q1.2 Q2.2 R2.1 R5.2 R6.2 R7.2 | length 70.7
  Top Layer w0.5: Q1.2 Q2.2 -48,17.2 -47.75,16.95 -45.4,16.95 ; R5.2 R5.2@-46.75,-13.95 ; R2.1 -45.4,16.95 ; R7.2 -29.05,-11.4 -31.6,-13.95 R5.2@-46.75,-13.95 ; R5.2@-46.75,-13.95 -46.8,-14 -46.9,-13.9 -48.2,-13.9 -49.9,-12.2 -49.9,-3.7 -45.4,0.8 -45.4,16.95
NetQ3_1: Q3.1 R5.1 | length 5.7
  Top Layer w0.5: R5.1 -46.75,-10.8 -46.75,-9.35 v2(-45,-7.6)
  Bottom Layer w1: Q3.1 -46.61,-7.6 v2(-45,-7.6)
NetQ4_1: Q4.1 R6.1 | length 5.5
  Top Layer w0.5: R6.1 -34,-9.1 -32.7,-7.8 v2(-32.5,-7.8)
  Bottom Layer w1: Q4.1 -34.16,-7.8 v2(-32.5,-7.8)
NetQ5_1: Q5.1 R7.1 | length 11.6
  Top Layer w0.5: R7.1 -25.95,-8.1 -25.65,-7.8 v2(-17.5,-7.8)
  Bottom Layer w0.5: Q5.1 Q5.1@-20.16,-7.8
  Bottom Layer w1: Q5.1@-20.16,-7.8 v2(-17.5,-7.8)
p: D17NE.K D17NW.K J1.35 J1.36 J1.37 J1.38 Q6NE.3 Q6NW.3 Q7NE.3 Q7NW.3
P0A: D12.K D13.K D14.K J1.57 J1.58
p1: D15.K D16.K J1.31 J1.32 J1.33 J1.34
T1A: C2NW.2 C3NW.2 D17NW.A D17SW.K J1.59 J1.60 J1.63 Q6NW.2 Q6SW.3 Q7NW.2 Q7SW.3 R13NW.1 | length 110
  Top Layer w0.5: R13NW.1 -18.75,-35.2 -18.75,-35.954 -17.204,-37.5 -16.65,-38.054 -16.65,-38.55 -16.261,-38.939 -16.089,-38.939 C2NW.2 ; C2NW.2@-15.927,-39 -14.9,-39 v2(-14.8,-39.1) -13.35,-39.1 C3NW.2
  Top Layer w1: v1(4.75,-45) 4.75,-44.5 3.25,-43 3.25,-18.25 5.5,-16 57.115,-16 57.365,-16.25 J1.59@58,-16.25 ; J1.63@58,-28.25 58,-28.114 54,-24.114 54,-20.386 58,-16.386 J1.59@58,-16.25 ; J1.60@61,-16.25 J1.59@58,-16.25
  other v1: 1.25,-47 3.5,-47 5.75,-47 2.5,-45 1.25,-43 3.5,-43 5.75,-43
T4A: C2NE.2 C3NE.2 D17NE.A D17SE.K J1.61 J1.62 J1.66 Q6NE.2 Q6SE.3 Q7NE.2 Q7SE.3 R13NE.1 | length 26.2
  Top Layer w1: v2(26.637,-39.015) 26.644,-39.009 26.644,-38.406 C2NE.2 30.55,-38.4 C3NE.2 ; C2NE.2@26.875,-38.175 26.875,-37.225 28.25,-35.85 R13NE.1 ; J1.66@61,-34.25 62.55,-34.25 64.75,-32.05 64.75,-24.55 62.493,-22.293 61.043,-22.293 J1.62@61,-22.25
T5A: D11.K D14.A J1.55 J1.56
T6A: D10.K D13.A J1.53 J1.54 | length 2.6
  Bottom Layer w2: D13.A@28.5,5.4 v1(28.5,8)
  other v1: 26.25,8 23.5,8.7 25.25,10 27.5,10 24,12 26.25,12 28.5,12
T7A: D5.K D8.A J1.49 J1.50
  other v1: 26.5,41 28.75,41 23,42.9 25.25,43 27.5,43 24.25,45 26.5,45 28.75,45
T8A: D6.K D9.A J1.51 J1.52
pads on no net: D1.NC D2.NC D3.NC D4.NC D5.NC D6.NC D7.NC D8.NC D9.NC D10.NC D11.NC D12.NC D13.NC D14.NC D15.NC D16.NC D17NE.NC D17NW.NC D17SE.NC D17SW.NC J1.S

## Polygon pours and split planes (outlines as drawn)
no net on Mechanical 16 "NONET_L-01_P-001" (solid): -76,69 76,69 76,-69 -76,-69
T4A on Bottom Layer "NONET_L01_P-001" (solid, pour order 13): 63,-25.5 64.5,-24 64.5,-19 63.8,-18.3 52.2,-18.3 48.5,-22 48.5,-37.5 47,-39 40,-39 37.6,-41.4 32.4,-41.4 29.5,-38.5 27,-38.5 23.7,-41.8 18,-41.8 17,-40.8 17,-39.5 16,-38.5 15.4,-38.5 14.3,-39.6 14.3,-53.1 14.7,-53.5 24.5,-53.5 25.5,-54.5 39.1,-54.5 43.7,-59.1 43.8,-59 52.5,-59 55.5,-56 55.5,-27.5 57.5,-25.5
T8A on Bottom Layer "NONET_L-01_P-001" (solid, pour order 22): 54.1,20.1 62.6,20.1 64.3,21.8 64.3,24.8 63,26.1 56,26.1 52.7,29.4 52.7,36.8 43.9,45.6 43.9,52 43.1,52.8 36.4,52.8 35.7,52.1 35.7,41.3 38.6,38.4 38.7,38.5 43.3,38.5 47.2,34.6 47.2,27
NetD1_K on Bottom Layer "NONET_L-01_P-001" (solid, pour order 21): -23.25,48.25 -23.25,40.35 -24.3,39.3 -41.8,39.3 -42.8,40.3 -42.8,48.8 -45.3,51.3 -63.8,51.3 -68,47.1 -68,33.5 -63.5,29 -57.5,29 -56.5,28 -56.5,25 -57.5,24 -66.5,24 -74,31.5 -74,50.5 -66,58.5 -33.5,58.5
T6A on Bottom Layer "NONET_L-01_P-001" (solid, pour order 20): 22.4,18.5 23.7,19.8 28.6,19.8 30.8,17.6 30.8,6.1 29,4.3 24.3,4.3 22.4,6.2
NetD1_A on Bottom Layer "NONET_L-01_P-001" (solid, pour order 11): -62.5,42.5 -64,44 -64,47 -63,48 -45.5,48 -44,46.5 -44,34.5 -40,30.5 -40,25.5 -41.5,24 -50.5,24 -52,25.5 -52,39.5 -55,42.5
NetD2_A on Bottom Layer "NONET_L-01_P-001" (solid, pour order 10): -63.5,17.5 -64.5,18.5 -64.5,20.5 -63.5,21.5 -41,21.5 -38,24.5 -38,30.5 -36.5,32 -26,32 -24.5,30.5 -24.5,17 -26.5,15 -36,15 -38.5,17.5
N0A on Bottom Layer "NONET_L01_P-001" (solid, pour order 18): 55,38.4 46.4,47 46.457,52.543 44.8,54.2 21.9,54.2 15.2,47.5 9,47.5 8,48.5 8,58.5 15.2,65.7 42.6,65.7 53.3,55 53.3,50.4 63.5,40.2 63.5,36.5 61.5,34.5 57.5,34.5 55,37
T5A on Bottom Layer "NONET_L01_P-001" (solid, pour order 17): 62,8.5 63,9.5 63,13 62,14 48,14 42.5,19.5 35.8,19.5 34.5,18.2 34.5,7.9 37.4,5 42.5,5 46,8.5
P0A on Bottom Layer "NONET_L01_P-001" (solid, pour order 16): 10.7,14.7 9.5,13.5 9.5,3 17,-4.5 58,-4.5 63,0.5 63,5.5 62.5,6 46.4,6 43.1,2.7 23.8,2.7 17.5,9 17.5,13.5 16.3,14.7
NetD7_K on Bottom Layer "NONET_L01_P-001" (solid, remove dead copper, pour order 14): 10,45.5 8.5,44 8.5,18 10.3,16.2 16.7,16.2 21.5,21 41.5,21 43.8,23.3 43.8,35.2 42,37 20.5,37 16.5,41 16.5,44 15,45.5
T1A on Bottom Layer "NONET_L-01_P-001" (solid, pour order 12): -31,-53.5 -32.5,-52 -32.5,-42 -30.5,-40 -29.5,-40 -28,-41.5 -18.5,-41.5 -15,-38 -12.5,-38 -9.3,-41.2 -4.1,-41.2 -1.4,-38.5 6,-38.5 7,-39.5 7,-53.5 5.5,-55 -0.5,-55 -2,-53.5
N1 on Bottom Layer "NONET_L-01_P-001" (solid, pour order 9): -58.5,-9.5 -57.5,-8.5 -57.5,-4.5 -58.5,-3.5 -62.5,-3.5 -65.5,-0.5 -65.5,8 -64,9.5 -57.5,9.5 -56,8 -56,3.626 -53,0.626 -53,-3.5 -51.5,-5 -45.5,-5 -44.5,-4 -41.5,-4 -40.2,-5.3 -31.8,-5.3 -31,-4.5 -27,-4.5 -26.2,-5.3 -18.8,-5.3 -17.5,-4 -17.5,5 -20.5,8 -45.5,8 -51,13.5 -68.5,13.5 -70.5,11.5 -70.5,-7 -68,-9.5
L2 on Bottom Layer "NONET_L-01_P-001" (solid, pour order 8): -63.7,-18.3 -65,-17 -65,-12 -64,-11 -55,-11 -52,-8 -50,-8 -47,-11 -43,-11 -40,-8 -38,-8 -35,-11 -29.5,-11 -26,-7.5 -24,-7.5 -20,-11.5 -20,-15.5 -22.8,-18.3
p1 on Bottom Layer "NONET_L-01_P-001" (solid, pour order 7): -63,-28 -65,-26 -65,-22 -63,-20 -24,-20 -23,-21 -23,-26 -25,-28
p on Bottom Layer "NONET_L-01_P-001" (solid, pour order 6): -64.9,-35.4 -64.9,-31.4 -62.9,-29.4 45.6,-29.4 47.5,-31.3 47.5,-36.3 46.9,-36.9 -63.4,-36.9
N-N1 on Bottom Layer "NONET_L-01_P-001" (solid, pour order 5): -63,-45.4 -64,-44.4 -64,-40.5 -63.1,-39.6 -48.4,-39.6 -46,-42 -46,-54.5 -48.2,-56.7 -55.9,-56.7 -56.6,-56 -56.6,-46.3 -57.5,-45.4
N-N1_SHUNT on Bottom Layer "NONET_L-01_P-001" (solid, pour order 4): -60,-61.1 -56.9,-58 -35.1,-58 -32.3,-55.2 -30.4,-55.2 -27.6,-58 -14.1,-58 -11.4,-55.3 -10.6,-55.3 -6.9,-59 10.6,-59 14.4,-55.2 15.6,-55.2 18.6,-58.2 24.3,-58.2 26.1,-56.4 29.7,-56.4 34.3,-61 50.6,-61 51.5,-61.9 51.5,-66 50,-67.5 -57.5,-67.5 -60,-65
T1A on Top Layer "NONET_L-01_P-001" (solid, pour order 3): 63,-18.62 63,-14.4 59.8,-11.2 6.5,-11.2 -1.2,-18.9 -1.2,-46.5 0.4,-48.1 6.3,-48.1 7.1,-47.3 7.1,-32.6 19.1,-20.6 61.2,-20.6
T6A on Top Layer "NONET_L-01_P-001" (solid, pour order 2): 22.3,7.4 24.2,5.5 28.6,5.5 30.3,7.2 30.3,9.3 34.1,13.1 60.9,13.1 62.9,15.1 62.9,19.3 61.6,20.6 24.8,20.6 22.3,18.1
T7A on Top Layer "NONET_L-01_P-001" (solid, pour order 1): 22.5,44.8 23.8,46.1 29.3,46.1 30.5,44.9 39.4,36 60.7,36 63.1,33.6 63.1,29.4 62.1,28.4 29.6,28.4 22.5,35.5
NetD3_A on Top Layer "NONET_L-01_P-001" (solid, pour order 0): -61.218,30.018 -63.7,32.5 -63.7,39.8 -61.3,42.2 -17.7,42.2 -15.25,39.75 -15.25,32.45 -17.537,30.163

## Other copper
Top Layer:
  rectangle net N-N1_SHUNT: 27.7,-54.9 32.6,-52.8
  rectangle net N-N1_SHUNT: 28,-54.8 30,-50.8
  rectangle net N1: -38.75,1.105 -25.449,14
  rectangle net NetD2_A: -38.75,15.8 -25.75,22.25
  text "1- TOP" at -3.756,30.3 h5 r90
Bottom Layer:
  rectangle net NetD3_A: -21.8,22.7 -14,43.3
  rectangle net T7A: 22.5,41.7 30,52.75
  region net N1: -50.895,-1.479 -50.895,3.521 -55.895,3.521
  text "2 - BOTTOM" at 1.144,29.995 h5 r90

## Silkscreen, mask and mechanical layers (free items; w line width, h text height)
Top Overlay:
  lines w0.2: -18,12 -19,12 ; -19,12 -19,2.5 -65,2.5 -65,55 -9,55 -9,12 -19,12 ; -65,-56 -65,-3.6 -19,-3.6 -19,-12 -11,-12 -7,-12 -7,-56 -65,-56 ; 7,-56 7,-12 21,-12 21,-11 65,-11 65,-56 7,-56 ; 7,12 7,55 65,55 65,3 21,3 21,12 7,12
  text "A.MONERA MARTINEZ" at -45.95,60.056 h5
Board:
  the board outline again, w0.2
  text "BOARD OUTLINE" at -72.5,70.256 h5
Dimensions:
  lines w0.2: -11,0 9,0 ; 0,-9.25 0,10.25
  lines w0.254: 64,-69.175 75.625,-69.175 75.625,68.975 64,68.975 64,-69.175
Mechanical 20 - TOP bracket:
  pour cut-out: -65,-3.5 -65,-56 -7,-56 -7,-12 -19.4,-12 -19.4,-3.5
  pour cut-out: 65,-10.9 65,-56 7,-56 7,-12 20.8,-12 20.8,-10.9
  pour cut-out: 65,55 65,2.4 20.9,2.4 20.9,12 7,12 7,55
  pour cut-out: -65,55 -65,2.6 -19.2,2.6 -19.2,12 -9,12 -9,55
  text "TOP BRACKET (MECHANICAL)" at -29.2,70.744 h5